# Altium PCB MD040_RevE2.PcbDoc (part 3 of 6)
Units mm, origin at the board's own origin, x right, y up, seen from the top; angles counter-clockwise.
Board outline 127 x 127 mm, 4 copper layers (Top Layer, Signal Layer 1, Signal Layer 2, Bottom Layer), stack 1.554 mm thick; 336 components, 206 nets, 924 pads, 303 vias.
Unrouted connection lines stored in the file: 125.
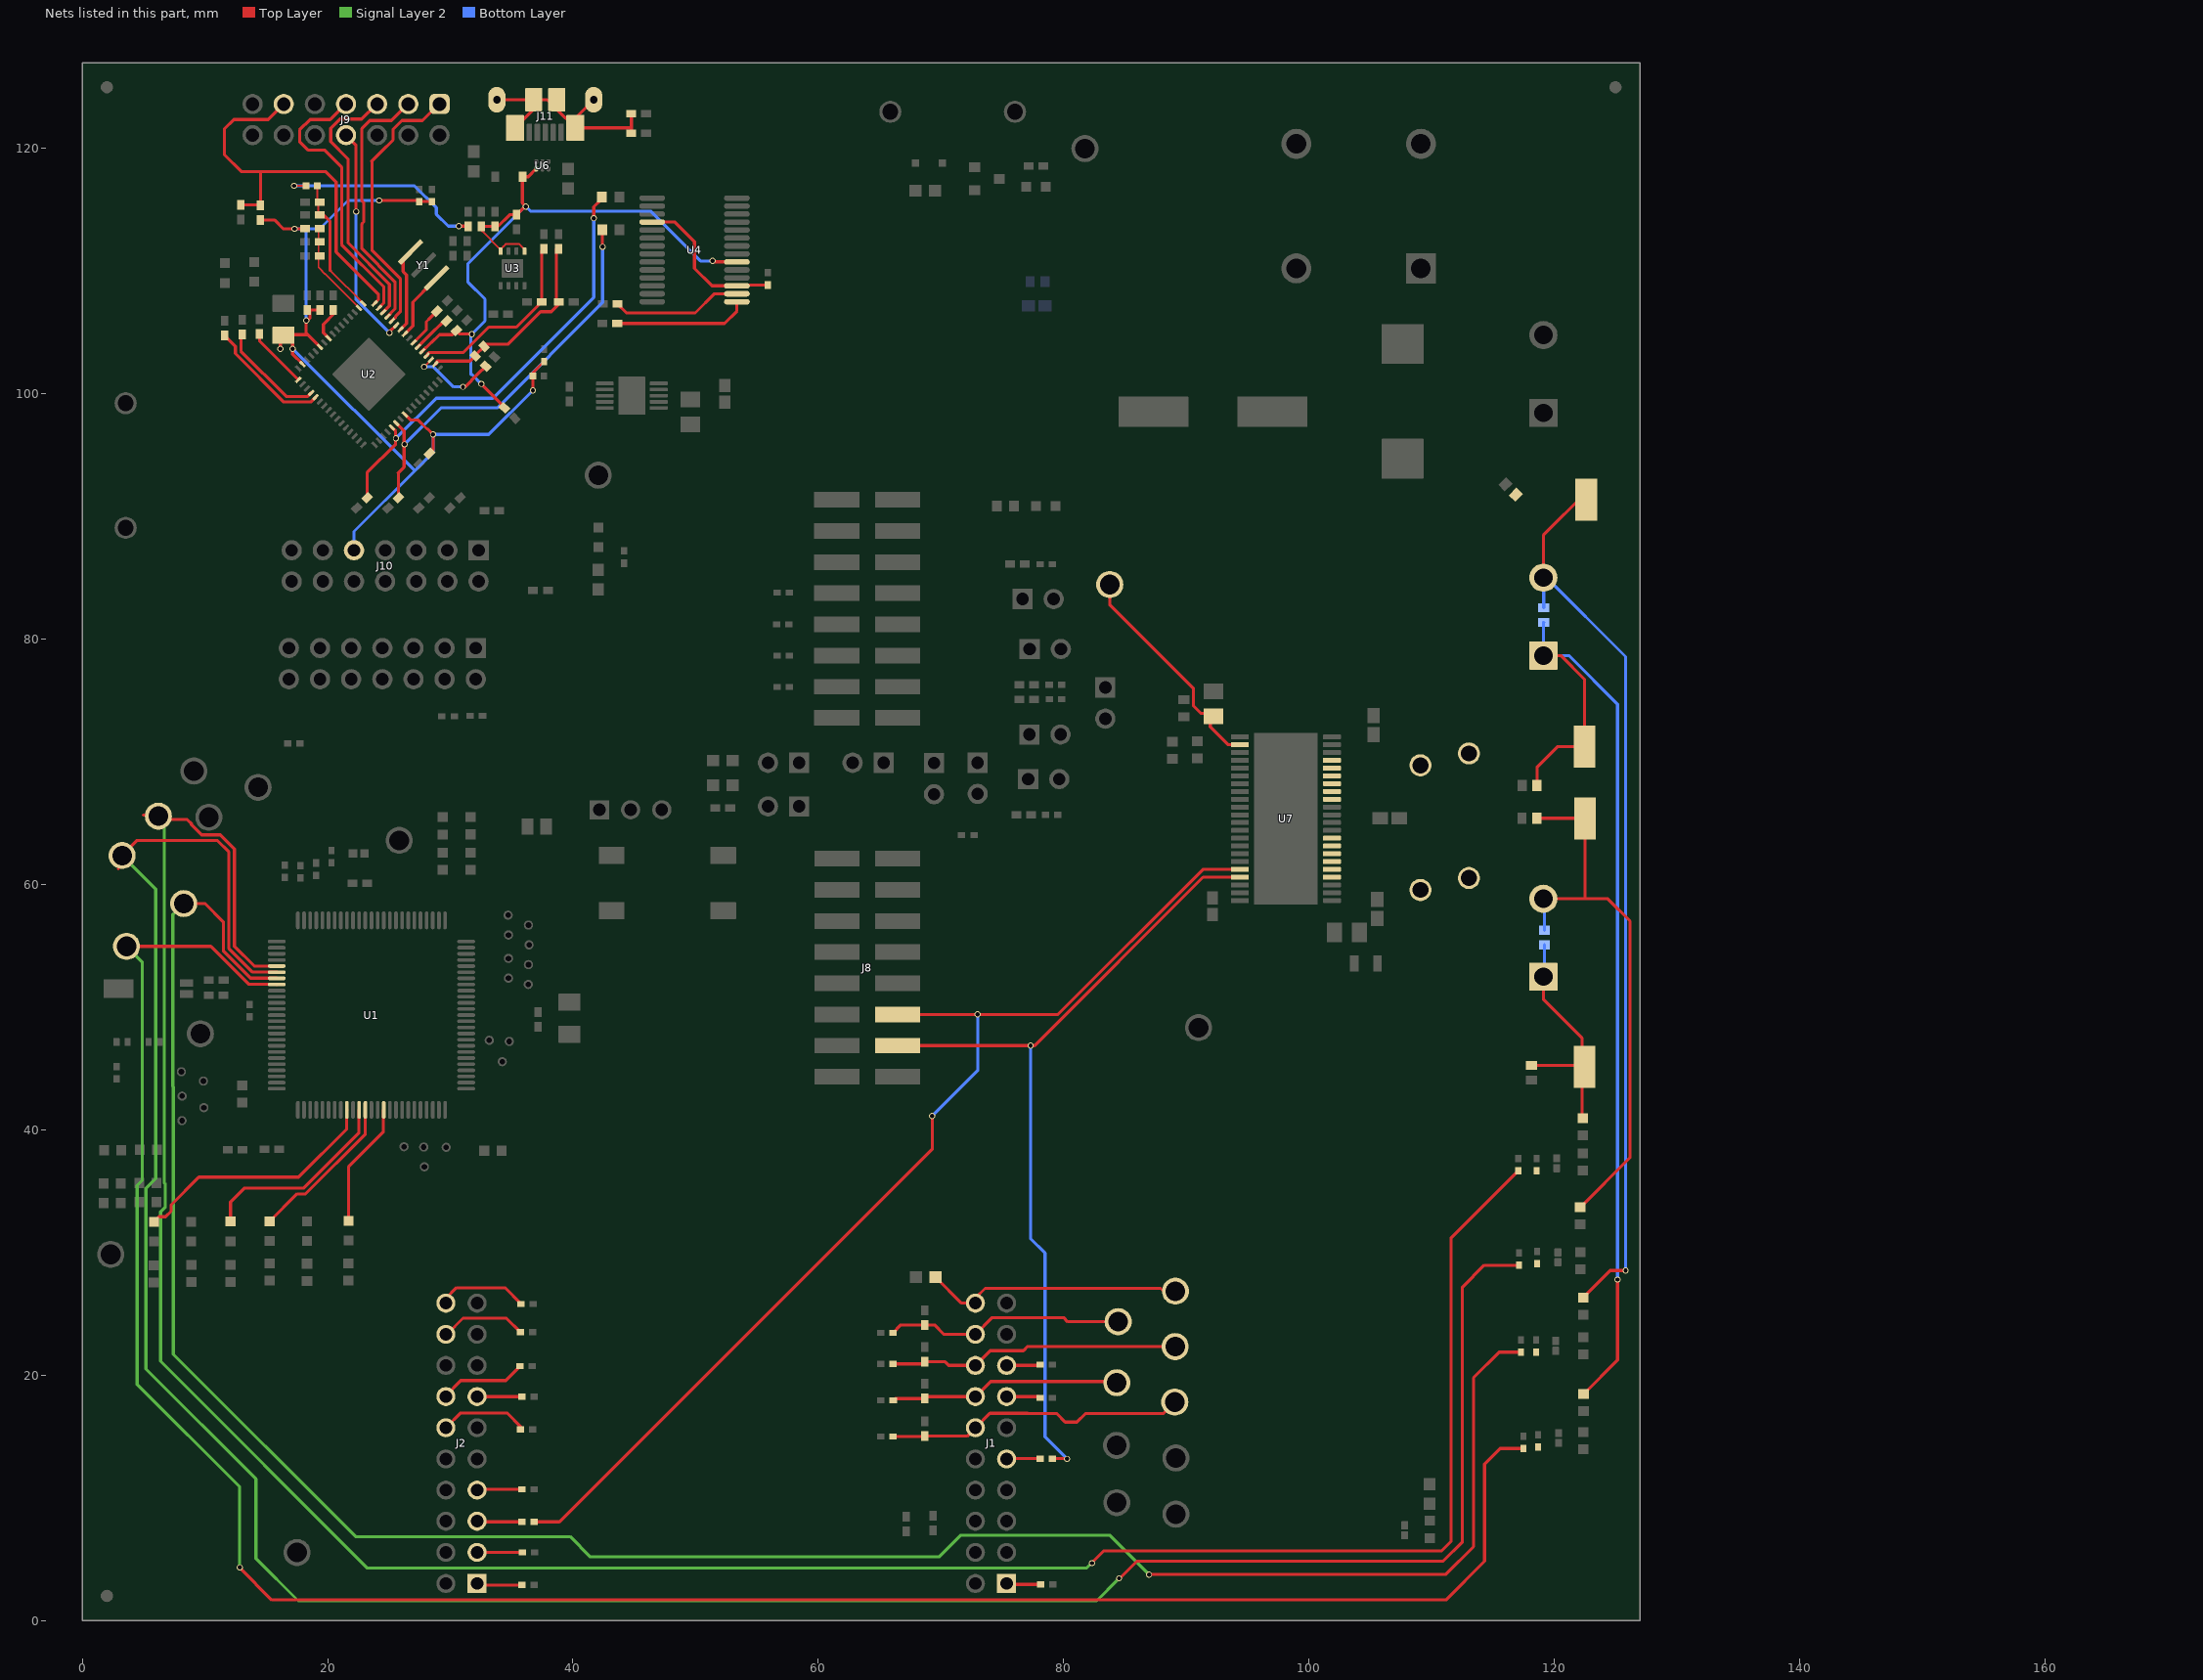
[diagram p5: the nets of this part, all layers, seen from the top]

## Footprints (in the part's own frame and the unit in brackets; to place one, negate y for a bottom-side part, rotate by r counter-clockwise, add the part's x,y. Pads: shape width x height; smd on the part's side, far side on the other; paste and mask are expansions set on the pad) (continued)
Wurth_61301421121 [mm] "Header, 2.54mm, 7x2, TH"
  rrect50% 1.65x1.65 hole 1.1: 1(-1.27,7.62)
  round 1.65 hole 1.1: 2(1.27,7.62) 3(-1.27,5.08) 4(1.27,5.08) 5(-1.27,2.54) 6(1.27,2.54) 7(-1.27,0) 8(1.27,0) 9(-1.27,-2.54) 10(1.27,-2.54) 11(-1.27,-5.08) 12(1.27,-5.08) 13(-1.27,-7.62) 14(1.27,-7.62)
  body extent -2.54,-8.89 2.54,8.89, height 8.55
XTAL_MS3V-T1R [mm] "Micro Crystal Switzerland recommended land pattern"
  rect 1.1x0.6 smd: 1(-2.775,0.45) 2(-2.775,-0.45)
  rect 2.4x1.5 smd: 3(2.775,0)
  silkscreen extent -1.9,-0.74 1.2,0.74, body extent -3.05,-0.74 3.65,0.74, height 1.42

## Part data
A1 A2 A3 A4 TP13 TP14 TP15 TP16 TP17 TP37 TP38 TP39 TP40 TP41 TP42 TP43 TP44 TP45 TP46: library part CMP-0055149-1, "Test Point, Multipurpose, White, TH", Color=White, Manufacturer=Keystone, Supplier Part Number 1=36-5012-ND, CNHeader=FALSE, ComponentLink1Description="Datasheet URL", ComponentLink1URL=http://www.keyelco.com/userAssets/file/M60-2p60.pdf, CompType="Test Point", ContactFinish=Silver, CT=TRUE, Green_EU RoHS=Passed, Green_EU RoHS-2=Incomplete, Green_Lifecycle=Active, Green_REACh=Passed, LatestRevisionDate=26/05/2017, MountType=TH, PackageReference="White Multipurpose Testpoint", PartNumber=5012, Publisher="Texas Instruments", RoHS=Y, Supplier 1=Digi-Key, Supplier 2=Mouser, Supplier Part Number 2=534-5012
C1 C2 C3 C4 C5 C6 C19 C22 C24: library part CMP-0006250-2, "CAP, CERM, 33 pF, 50 V, +/- 5%, C0G/NP0, 0402", Cap_Case=0402, Manufacturer=TDK, Supplier Part Number 1=445-1241-1-ND, TempCo=C0G/NP0, Tolerance_%=5%, Value1=Unknown, Value2=50V, ValueDisplayed=33pF, AEC Category=Q200, AEC Qualified=?, Cap_F=33pF, ComponentLink1Description="Datasheet link", ComponentLink1URL=http://product.tdk.com/en/catalog/datasheets/mlcc_commercial_general_en.pdf, CompType=Capacitor, LatestRevisionDate=2017-03-09, MountType=SMT, PackageReference=0402, PartNumber=C1005C0G1H330J050BA, Polarized=N, Published=2008-06-19, Publisher="Texas Instruments", RoHS=Y, SizeArea_mm2=0.5, SizeAreaWB_mm2=3, SizeX_mm=1, SizeY_mm=0.5, SizeZ_mm=0.6, Supplier 1=Digi-Key, Supplier 2=Newark, Supplier 3=Mouser, Supplier Part Number 2=72W1722, Supplier Part Number 3=810-C1005C0G1H330J, TaMax_C=125°C, TaMin_C=-55°C, Technology=Ceramic, U/M=EA, VDC_V=50V
C7 C8 C9 C10 C11 C12 C15 C41 C62: library part CMP-0006221-1, "CAP, CERM, 0.1 uF, 10 V, +/- 20%, X5R, 0402", Cap_Case=0402, Manufacturer="Wurth Elektronik", Supplier Part Number 1=732-7487-1-ND, TempCo=X5R, Tolerance_%=20%, Value1=Unknown, Value2=10V, ValueDisplayed=0.1uF, AEC Category=Q200, AEC Grade=N/A, AEC Qualified=N, Cap_F=100nF, ComponentLink1Description="Datasheet link", ComponentLink1URL=http://katalog.we-online.de/pbs/datasheet/885012105010.pdf, CompType=Capacitor, LatestRevisionDate=2017-03-09, MountType=SMT, PackageReference=0402, PartNumber=885012105010, Polarized=N, Published=2008-06-19, Publisher="Texas Instruments", RoHS=Y, SizeArea_mm2=0.5, SizeAreaWB_mm2=3, SizeX_mm=1, SizeY_mm=0.5, SizeZ_mm=0.6, Supplier 1=Digi-Key, Supplier 2=Mouser, Supplier Part Number 2=710-885012105010, TaMax_C=85°C, TaMin_C=-55°C, Technology=Ceramic, U/M=EA, VDC_V=10V
C13: library part CMP-0006580-1, "CAP, CERM, 0.47 uF, 10 V, +/- 10%, X5R, 0402", Cap_Case=0402, Manufacturer=MuRata, Supplier Part Number 1=490-3264-1-ND, TempCo=X5R, Tolerance_%=10%, Value1=Unknown, Value2=10V, ValueDisplayed=0.47uF, AEC Category=Q200, AEC Qualified=?, Cap_F=470nF, ComponentLink1Description="Datasheet link", ComponentLink1URL=http://search.murata.co.jp/Ceramy/PnsearchViewAction.do?HnOFG=ON&HnNFG=ON&SEL_CNT=50&sLang=en&sKey=GRM155R61A474KE15D&x=9&y=9&search=startwith, CompType=Capacitor, LatestRevisionDate=2017-03-09, MountType=SMT, PackageReference=0402, PartNumber=GRM155R61A474KE15D, Polarized=N, Published=2008-06-19, Publisher="Texas Instruments", RoHS=Y, SizeArea_mm2=0.5, SizeAreaWB_mm2=3, SizeX_mm=1, SizeY_mm=0.5, SizeZ_mm=0.6, Supplier 1=Digi-Key, Supplier 2=Newark, Supplier 3=Mouser, Supplier Part Number 2=14T3277, Supplier Part Number 3=81-GRM155R61A474KE5D, TaMax_C=85°C, TaMin_C=-55°C, Technology=Ceramic, U/M=EA, VDC_V=10V
C14 C31: library part CMP-0084376-1, "CAP, Tantalum Polymer, 10 µF, 10 V,+/- 20%, 0.08 ohm, 3216-18 SMD", Cap_Case=3216-18, Manufacturer=Kemet, Tolerance_%=20%, Value1="0.08 ohm", Value2=10V, ValueDisplayed=10µF, AEC Category=Q200, AEC Grade=N/A, AEC Qualified=N, Cap_F=10µF, ComponentLink1Description="Datasheet link", ComponentLink1URL=https://content.kemet.com/datasheets/KEM_T2076_T52X-530.pdf, CompType=Capacitor, ESR_ohm=0.08, MountType=SMT, PackageReference=3216-18, PartNumber=T520A106M010ATE080, Polarized=Y, RoHS=Y, Series=T520, SizeArea_mm2=5.12, SizeAreaWB_mm2=10.92, SizeX_mm=3.2, SizeY_mm=1.6, SizeZ_mm=1.8, TaMax_C=105°C, TaMin_C=-55°C, Technology="Tantalum Polymer", VDC_V=10V
C16 C17 C18 C21 C25 C32 C33 C34 C36 C48: library part CMP-0006562-2, "CAP, CERM, 0.1 uF, 10 V, +/- 10%, X5R, 0402", Cap_Case=0402, Manufacturer=MuRata, Supplier Part Number 1=490-1318-1-ND, TempCo=X5R, Tolerance_%=10%, Value1=Unknown, Value2=10V, ValueDisplayed=0.1uF, AEC Category=Q200, AEC Qualified=?, Cap_F=100nF, ComponentLink1Description="Datasheet link", ComponentLink1URL=http://search.murata.co.jp/Ceramy/PnsearchViewAction.do?HnOFG=ON&HnNFG=ON&SEL_CNT=50&sLang=en&sKey=GRM155R61A104KA01D&x=9&y=9&search=startwith, CompType=Capacitor, LatestRevisionDate=2017-03-09, MountType=SMT, PackageReference=0402, PartNumber=GRM155R61A104KA01D, Polarized=N, Published=2008-06-19, Publisher="Texas Instruments", RoHS=Y, SizeArea_mm2=0.5, SizeAreaWB_mm2=3, SizeX_mm=1, SizeY_mm=0.5, SizeZ_mm=0.6, Supplier 1=Digi-Key, Supplier 2=Mouser, Supplier 3=Farnell, Supplier Part Number 2=81-GRM155R61A104KA01, Supplier Part Number 3=1828862, TaMax_C=85°C, TaMin_C=-55°C, Technology=Ceramic, U/M=EA, VDC_V=10V
C20: library part CMP-0006269-2, "CAP, CERM, 4.7 uF, 10 V, +/- 20%, X5R, 0402", Cap_Case=0402, Manufacturer=TDK, Supplier Part Number 1=445-8023-1-ND, TempCo=X5R, Tolerance_%=20%, Value1=Unknown, Value2=10V, ValueDisplayed=4.7uF, AEC Category=Q200, AEC Grade=N/A, AEC Qualified=N, Cap_F=4.7µF, ComponentLink1Description="Datasheet link", ComponentLink1URL=http://product.tdk.com/en/catalog/datasheets/mlcc_commercial_general_en.pdf, CompType=Capacitor, LatestRevisionDate=2017-03-09, MountType=SMT, PackageReference=0402, PartNumber=C1005X5R1A475M050BC, Polarized=N, Published=2008-06-19, Publisher="Texas Instruments", RoHS=Y, SizeArea_mm2=0.5, SizeAreaWB_mm2=3, SizeX_mm=1, SizeY_mm=0.5, SizeZ_mm=0.6, Supplier 1=Digi-Key, Supplier 2=Newark, Supplier 3=Mouser, Supplier Part Number 2=04X3214, Supplier Part Number 3=810-C1005X5R1A475M, TaMax_C=85°C, TaMin_C=-55°C, Technology=Ceramic, U/M=EA, VDC_V=10V
C23: library part CMP-0006673-2, "CAP, CERM, 1000 pF, 50 V, +/- 10%, X7R, 0402", Cap_Case=0402, Manufacturer=MuRata, Supplier Part Number 1=490-1303-1-ND, TempCo=X7R, Tolerance_%=10%, Value1=Unknown, Value2=50V, ValueDisplayed=1000pF, AEC Category=Q200, AEC Qualified=?, Cap_F=1nF, ComponentLink1Description="Datasheet link", ComponentLink1URL=http://search.murata.co.jp/Ceramy/PnsearchViewAction.do?HnOFG=ON&HnNFG=ON&SEL_CNT=50&sLang=en&sKey=GRM155R71H102KA01D&x=9&y=9&search=startwith, CompType=Capacitor, LatestRevisionDate=2017-03-09, MountType=SMT, PackageReference=0402, PartNumber=GRM155R71H102KA01D, Polarized=N, Published=2008-06-19, Publisher="Texas Instruments", RoHS=Y, SizeArea_mm2=0.5, SizeAreaWB_mm2=3, SizeX_mm=1, SizeY_mm=0.5, SizeZ_mm=0.6, Supplier 1=Digi-Key, Supplier 2=Newark, Supplier 3=Mouser, Supplier Part Number 2=14T3283, Supplier Part Number 3=81-GRM36X102K50, TaMax_C=125°C, TaMin_C=-55°C, Technology=Ceramic, U/M=EA, VDC_V=50V
C26 C27 C42 C43: library part CMP-0064916-2, "CAP, CERM, 10 pF, 50 V,+/- 1%, C0G/NP0, 0402", Cap_Case=0402, Manufacturer=MuRata, Supplier Part Number 1=490-6186-1-ND, TempCo=C0G/NP0, Tolerance_%=1%, Value1=Unknown, Value2=50V, ValueDisplayed=10pF, AEC Category=Q200, AEC Grade=N/A, AEC Qualified=N, Cap_F=10pF, ComponentLink1Description="Datasheet link", ComponentLink1URL=http://psearch.en.murata.com/capacitor/product/GRM1555C1H100FA01%23.pdf, CompType=Capacitor, LatestRevisionDate=2017-06-05, MountType=SMT, PackageReference=0402, PartNumber=GRM1555C1H100FA01D, Polarized=N, Published=2008-06-19, Publisher="Texas Instruments", RoHS=Y, SizeArea_mm2=0.5, SizeAreaWB_mm2=3, SizeX_mm=1, SizeY_mm=0.5, SizeZ_mm=0.6, Supplier 1=Digi-Key, Supplier 2=Mouser, Supplier Part Number 2=81-GRM1555C1H100FA1D, TaMax_C=125°C, TaMin_C=-55°C, Technology=Ceramic, U/M=EA, VDC_V=50V
C28 C30 C47: library part CMP-0006570-2, "CAP, CERM, 0.22 uF, 10 V, +/- 10%, X5R, 0402", Cap_Case=0402, Manufacturer=MuRata, Supplier Part Number 1=490-3910-1-ND, TempCo=X5R, Tolerance_%=10%, Value1=Unknown, Value2=10V, ValueDisplayed=0.22uF, AEC Category=Q200, AEC Qualified=?, Cap_F=220nF, ComponentLink1Description="Datasheet link", ComponentLink1URL=http://search.murata.co.jp/Ceramy/PnsearchViewAction.do?HnOFG=ON&HnNFG=ON&SEL_CNT=50&sLang=en&sKey=GRM155R61A224KE19D&x=9&y=9&search=startwith, CompType=Capacitor, LatestRevisionDate=2017-03-09, MountType=SMT, PackageReference=0402, PartNumber=GRM155R61A224KE19D, Polarized=N, Published=2008-06-19, Publisher="Texas Instruments", RoHS=Y, SizeArea_mm2=0.5, SizeAreaWB_mm2=3, SizeX_mm=1, SizeY_mm=0.5, SizeZ_mm=0.6, Supplier 1=Digi-Key, Supplier 2=Newark, Supplier 3=Mouser, Supplier Part Number 2=38K1646, Supplier Part Number 3=81-GRM155R61A224KE19, TaMax_C=85°C, TaMin_C=-55°C, Technology=Ceramic, U/M=EA, VDC_V=10V
C29: library part CMP-0006600-2, "CAP, CERM, 0.47 uF, 16 V, +/- 10%, X5R, 0402", Cap_Case=0402, Manufacturer=MuRata, TempCo=X5R, Tolerance_%=10%, Value1=Unknown, Value2=16V, ValueDisplayed=0.47uF, AEC Category=Q200, AEC Qualified=?, Cap_F=470nF, ComponentLink1Description="Datasheet link", ComponentLink1URL=http://psearch.murata.com/capacitor/product/GRM155R61C474KE01%23.pdf, CompType=Capacitor, LatestRevisionDate=2017-03-09, MountType=SMT, PackageReference=0402, PartNumber=GRM155R61C474KE01, Polarized=N, Published=2008-06-19, Publisher="Texas Instruments", RoHS=Y, SizeArea_mm2=0.5, SizeAreaWB_mm2=3, SizeX_mm=1, SizeY_mm=0.5, SizeZ_mm=0.6, TaMax_C=85°C, TaMin_C=-55°C, Technology=Ceramic, U/M=EA, VDC_V=16V
C35 C40 C45: library part CMP-0064924-2, "CAP, CERM, 1 uF, 10 V,+/- 20%, X5R, 0402", Cap_Case=0402, Manufacturer="Wurth Elektronik", Supplier Part Number 1=732-7489-1-ND, TempCo=X5R, Tolerance_%=20%, Value1=Unknown, Value2=10V, ValueDisplayed=1uF, AEC Category=Q200, AEC Grade=N/A, AEC Qualified=N, Cap_F=1µF, ComponentLink1Description="Datasheet link", ComponentLink1URL=http://katalog.we-online.de/pbs/datasheet/885012105012.pdf, CompType=Capacitor, LatestRevisionDate=2017-06-05, MountType=SMT, PackageReference=0402, PartNumber=885012105012, Polarized=N, Published=2008-06-19, Publisher="Texas Instruments", RoHS=Y, SizeArea_mm2=0.5, SizeAreaWB_mm2=3, SizeX_mm=1, SizeY_mm=0.5, SizeZ_mm=0.6, Supplier 1=Digi-Key, Supplier 2=Newark, Supplier 3=Mouser, Supplier Part Number 2=75Y5997, Supplier Part Number 3=710-885012105012, TaMax_C=85°C, TaMin_C=-55°C, Technology=Ceramic, U/M=EA, VDC_V=10V
C37 C39: library part CMP-0006639-2, "CAP, CERM, 0.01 uF, 16 V, +/- 10%, X7R, 0402", Cap_Case=0402, Manufacturer=MuRata, Supplier Part Number 1=490-1313-1-ND, TempCo=X7R, Tolerance_%=10%, Value1=Unknown, Value2=16V, ValueDisplayed=0.01uF, AEC Category=Q200, AEC Qualified=?, Cap_F=10nF, ComponentLink1Description="Datasheet link", ComponentLink1URL=http://search.murata.co.jp/Ceramy/PnsearchViewAction.do?HnOFG=ON&HnNFG=ON&SEL_CNT=50&sLang=en&sKey=GRM155R71C103KA01D&x=9&y=9&search=startwith, CompType=Capacitor, LatestRevisionDate=2017-03-09, MountType=SMT, PackageReference=0402, PartNumber=GRM155R71C103KA01D, Polarized=N, Published=2008-06-19, Publisher="Texas Instruments", RoHS=Y, SizeArea_mm2=0.5, SizeAreaWB_mm2=3, SizeX_mm=1, SizeY_mm=0.5, SizeZ_mm=0.6, Supplier 1=Digi-Key, Supplier 2=Newark, Supplier 3=Mouser, Supplier Part Number 2=14T3279, Supplier Part Number 3=81-GRM36X103K16, TaMax_C=125°C, TaMin_C=-55°C, Technology=Ceramic, U/M=EA, VDC_V=16V
C38: library part CMP-0006594-2, "CAP, CERM, 2.2 uF, 16 V, +/- 10%, X5R, 0402", Cap_Case=0402, Manufacturer=MuRata, PartNumber=GRM155R61C225KE11D, Supplier Part Number 1=490-10695-1-ND, TempCo=X5R, Tolerance_%=10%, Value1=Unknown, Value2=16V, AEC Category=Q200, AEC Grade=N/A, AEC Qualified=N, Cap_F=2.2µF, ComponentLink1Description="Datasheet link", ComponentLink1URL=http://psearch.en.murata.com/capacitor/product/GRM155R61C225KE11%23.pdf, CompType=Capacitor, LatestRevisionDate=2017-03-09, MountType=SMT, PackageReference=0402, Polarized=N, Published=2008-06-19, Publisher="Texas Instruments", RoHS=Y, SizeArea_mm2=0.5, SizeAreaWB_mm2=3, SizeX_mm=1, SizeY_mm=0.5, SizeZ_mm=0.6, Supplier 1=Digi-Key, Supplier 2=Mouser, Supplier Part Number 2=81-GRM155R61C225KE1D, TaMax_C=85°C, TaMin_C=-55°C, Technology=Ceramic, U/M=EA, ValueDisplayed=2.2uF, VDC_V=16V
C44 C50 C55: library part CMP-14477-003474-1, "Ceramic Capacitor General Use 0.1uF ±20% 100V X5R 0603", Capacitance=100nF, Case/Package=Ceramic, Dielectric=X5R, Max Operating Temperature=85°C, Min Operating Temperature=-55°C, Tolerance=20%, Voltage Rating=100V, Depth=0.8mm, Halogen Free="Halogen Free", Lead Free="Lead Free", Length=1.6mm, Mount="Surface Mount", Packaging="Tape and Reel", Radiation Hardening=No, RoHS Compliant=Yes, Thickness=0.035inch, Voltage Rating (DC)=100V, Width=0.031inch
C46: library part CMP-0008271-1, "CAP, CERM, 3.3 uF, 25 V, +/- 10%, X6S, 0805", Cap_Case=0805, Manufacturer=MuRata, Supplier Part Number 1=GRM21BC81E335KA73L-ND, TempCo=X6S, Tolerance_%=10%, Value1=Unknown, Value2=25V, ValueDisplayed=3.3uF, AEC Category=Q200, AEC Qualified=?, Cap_F=3.3µF, ComponentLink1Description="Datasheet link", ComponentLink1URL=http://search.murata.co.jp/Ceramy/PnsearchViewAction.do?HnOFG=ON&HnNFG=ON&SEL_CNT=50&sLang=en&sKey=GRM21BC81E335KA73L&x=9&y=9&search=startwith, CompType=Capacitor, LatestRevisionDate=2017-03-09, MountType=SMT, PackageReference=0805, PartNumber=GRM21BC81E335KA73L, Polarized=N, Published=2008-06-19, Publisher="Texas Instruments", RoHS=Y, SizeArea_mm2=2.5, SizeAreaWB_mm2=6.75, SizeX_mm=2, SizeY_mm=1.25, SizeZ_mm=1.45, Supplier 1=Digi-Key, Supplier 2=Mouser, Supplier Part Number 2=81-GRM21BC81E335KA3L, TaMax_C=105°C, TaMin_C=-55°C, Technology=Ceramic, U/M=EA, VDC_V=25V
C49 C51: library part CMP-0007873-2, "CAP, CERM, 1 uF, 50 V, +/- 10%, X7R, 0805", Cap_Case=0805, Manufacturer=TDK, Supplier Part Number 1=445-7547-1-ND, TempCo=X7R, Tolerance_%=10%, Value1="0.008782 ohm", Value2=50V, ValueDisplayed=1uF, AEC Category=Q200, AEC Grade=N/A, AEC Qualified=N, Cap_F=1µF, ComponentLink1Description="Datasheet link", ComponentLink1URL=https://product.tdk.com/en/search/capacitor/ceramic/mlcc/info?part_no=C2012X7R1H105K125AB, CompType=Capacitor, ESR_ohm=8.782m, IRMS_A=2.2049A, LatestRevisionDate=2017-03-09, MountType=SMT, PackageReference=0805, PartNumber=C2012X7R1H105K125AB, Polarized=N, Published=2008-06-19, Publisher="Texas Instruments", RoHS=Y, SizeArea_mm2=2.5, SizeAreaWB_mm2=6.75, SizeX_mm=2, SizeY_mm=1.25, SizeZ_mm=1.45, Supplier 1=Digi-Key, Supplier 2=Mouser, Supplier Part Number 2=810-C2012X7R1H105K, TaMax_C=125°C, TaMin_C=-55°C, Technology=Ceramic, U/M=EA, VDC_V=50V
C52 C54 C60 C61 C64 C65 C66: library part CMP-2006-03016-2, "CAP CER 1000PF 100V X7R 0603", Capacitance="1,000 pF", Manufacturer=KEMET, Package=C0603C-CF, Temperature="-55°C to +125°C", Temperature Characteristic=X7R, Temperature Coefficient=30ppm/°C, Temperature Range High=+125°C, Temperature Range Low=-55°C, Tolerance=0.1, Voltage Rating="100 V", Automotive=Yes, Automotive Grade="Grade 1", Category=Cap, ComponentLink2Description=Datasheet, ComponentLink2URL=https://api.kemet.com/component-edge/download/datasheet/C0603C100J5GACAUTO.pdf, Device Class L1="Passive Components", Device Class L2=Capacitors, Device Class L3="Ceramic Capacitors", Digikey Description="CAP CER 1000PF 100V X7R 0603", Height=0.87mm, Lead Free=Yes, Manufacturer Part Number=C0603C102K1RACAUTO, Material=Ceramic, Mouser Description="Multilayer Ceramic Capacitors MLCC - SMD/SMT 1000pF 100volts 10% X7R AUTO", Octopart=https://octopart.com/c0603c102k1racauto-kemet-12573995, RoHS=TRUE
C53: library part CMP-0094051-1, "100uF 100V 20% Aluminum Electrolytic Capacitors Radial, Can - SMD - 5000 Hrs @ 105°C", Digikey Part Number=565-2511-1-ND, Leakage Current=100uA, Manufacturer="United Chemi-Con", Mouser Part Number=661-EMVY101ARA101MKE, Operating Temperature Range="-40°C to +105°C", Tolerance_%=20%, ValueDisplayed=100uF, AEC Grade="Grade 2", AEC Qualified=Yes, Cap_F=100µF, ComponentLink1Description=Datasheet, ComponentLink1URL=https://www.chemi-con.co.jp/products/relatedfiles/capacitor/catalog/MVYRA-e.PDF, datasheet=https://www.chemi-con.co.jp/products/relatedfiles/capacitor/catalog/MVYRA-e.PDF, Datasheet Path=datasheets/Cap-EMVY101ARA101MKE0S.pdf, Digikey Description="CAP ALUM 100UF 20% 100V SMD", Dissipation Factor=10%, helpURL=https://upverter.com/upn/revision/452647827c621875/, IRMS_A=450mA, Lead Free=Yes, Life=5000Hours, Mouser Description="Cap Aluminum Lytic 100uF 100V 20% (12.5 X 13.5mm) SMD 450mA 5000h 105C Automotive T/R", PackageReference=RADIAL, Part Number=EMVY101ARA101MKE0S, PartNumber=EMVY101ARA101MKE0S, RoHS=TRUE, SizeZ_mm=14mm, Supplier 1=Digikey, Supplier 2=Mouser, Supplier Part Number 1=565-2511-1-ND, Supplier Part Number 2=661-EMVY101ARA101MKE, VDC_V=100V
C56: library part CMP-06035-000063-1, "CAP CER 1UF 100V X7S 0805", Capacitance=1uF, Manufacturer=Murata, Package=GRM21-0.2, Temperature="-55°C to +125°C", Temperature Characteristic=X7S, Temperature Coefficient=22%, Temperature Range High=+125°C, Temperature Range Low=-55°C, Tolerance=10%, Voltage Rating=100V, Automotive=No, Category=Cap, ComponentLink2Description=Datasheet, ComponentLink2URL=https://search.murata.co.jp/Ceramy/image/img/A01X/G101/ENG/GRM21BC72A105KE01-01A.pdf, Device Class L1="Passive Components", Device Class L2=Capacitors, Device Class L3="Ceramic Capacitors", Digikey Description="CAP CER 1UF 100V X7S 0805", Height=1.45mm, Ipc Land Pattern Name=CAPC200125X125, Lead Free=Yes, Manufacturer Part Number=GRM21BC72A105KE01L, Material=Ceramic, Octopart=https://octopart.com/grm21bc72a105ke01l-murata-71014565, RoHS=TRUE
C57 C58 C59: library part CMP-14477-001102-1, "Ceramic Capacitor General Use 0.01uF ±20% 100V X7R 0603", Capacitance=10nF, Case/Package=0603, Max Operating Temperature=125°C, Min Operating Temperature=-55°C, Tolerance=20%, Voltage Rating=100V, Length=0.063inch, Mount="Surface Mount", Packaging="Tape and Reel", RoHS Compliant=Yes, Thickness=0.035inch, Width=0.031inch
C63: library part CMP-1035-02591-1, "CAP 100nF 50V ±5% 0603 (1608 Metric) Thickness 1mm SMD", Case-EIA=0603, Case-Metric=1608, Rated Voltage="50 V", Tolerance=Â±5%, Max Thickness="1 mm", Technology=SMT
C67 C68 C69 C70 C71: library part CMP-0087080-2, "CAP CER 100PF 100V X8R 0402", Manufacturer=Kemet, TempCo=15%, Tolerance_%=5%, AEC Grade=NA, AEC Qualified=No, Cap_F=100pF, ComponentLink1Description=Datasheet, ComponentLink1URL=https://content.kemet.com/datasheets/KEM_C1007_X8R_ULTRA_150C_SMD.pdf, PackageReference=0402, PartNumber=C0402C101J1HACTU, RoHS=TRUE, SizeZ_mm=0.55mm, Symbol Name=SYM-C0402C101J1HAC, VDC_V=100V
C72 C73: library part CMP-0006227-2, "CAP, CERM, 0.01 uF, 16 V, +/- 10%, X7R, 0402", Cap_Case=0402, Manufacturer="Wurth Elektronik", Supplier Part Number 1=710-885012205031, TempCo=X7R, Tolerance_%=10%, Value1=Unknown, Value2=16V, ValueDisplayed=0.01uF, AEC Category=Q200, AEC Grade=N/A, AEC Qualified=N, Cap_F=10nF, ComponentLink1Description="Datasheet link", ComponentLink1URL=http://katalog.we-online.de/pbs/datasheet/885012205031.pdf, CompType=Capacitor, LatestRevisionDate=2017-03-09, MountType=SMT, PackageReference=0402, PartNumber=885012205031, Polarized=N, Published=2008-06-19, Publisher="Texas Instruments", RoHS=Y, SizeArea_mm2=0.5, SizeAreaWB_mm2=3, SizeX_mm=1, SizeY_mm=0.5, SizeZ_mm=0.6, Supplier 1=Mouser, TaMax_C=125°C, TaMin_C=-55°C, Technology=Ceramic, U/M=EA, VDC_V=16V
C74: library part CMP-1036-03017-2, "CAP CER 1100PF 50V NP0 0805", Capacitance="1,100 pF", Manufacturer=KEMET, Manufacturer Part Number=C0805C112F5GACTU, Package=C0805C-DN, Temperature="-55°C to +125°C", Temperature Characteristic=C0G, Temperature Coefficient=30ppm/°C, Temperature Range High=+125°C, Temperature Range Low=-55°C, Tolerance=0.01, Voltage Rating="50 V", Automotive=No, Category=Cap, ComponentLink2Description=Datasheet, ComponentLink2URL=https://content.kemet.com/datasheets/KEM_C1003_C0G_SMD.pdf, Device Class L1="Passive Components", Device Class L2=Capacitors, Device Class L3="Ceramic Capacitors", Digikey Description="CAP CER 1100PF 50V NP0 0805", Height=0.88mm, Ipc Land Pattern Name=CAPC200125X78, Lead Free=Yes, Material=Ceramic, Mouser Description="Multilayer Ceramic Capacitors MLCC - SMD/SMT 50volts 1100pF C0G 1%", Octopart=https://octopart.com/c0805c112f5gactu-kemet-19050258, RoHS=TRUE
D1: library part CMP-0002947-3, "LED, Red, SMD", Color=Red, Manufacturer="Wurth Elektronik", Power_TotalModule=72mW, Value1=0.072W, Value2=2V, Angle=140, ComponentLink1Description="Datasheet link", ComponentLink1URL=http://katalog.we-online.de/led/datasheet/150060RS75000.pdf, CompType=LED, Io_A=30mA, MountType=SMT, PackageReference=LED_0603, PartNumber=150060RS75000, RoHS=Y, TJmax_C=85°C, Type=AlInGaP, Vf_V=2V, Vr_V=5V
D2: "LED, Green, SMD", Color=green, Manufacturer="Wurth Elektronik", PartNumber=150060VS75000, Value1=W, Value2=2V, ComponentLink1Description="Datasheet link", ComponentLink1URL=http://katalog.we-online.de/led/datasheet/150060VS75000.pdf, CompType=LED, Io_A=20mA, MountType=SMT, PackageReference=LED_0603, RoHS=Y, Type=AlInGaP, Vf_V=2V
D3: library part CMP-1055-00457-1, "Schottky Barrier Diode, 2-Pin SOD-323, Pb-Free, Tape and Reel", Manufacturer="On Semiconductor", ComponentLink1Description="Manufacturer URL", ComponentLink1URL=http://www.onsemi.com/, ComponentLink2Description=Datasheet, ComponentLink2URL=http://www.onsemi.cn/pub_link/Collateral/MMDL770T1-D.PDF, ComponentLink3Description="Package Specification", ComponentLink3URL=http://www.onsemi.com/pub_link/Collateral/477-02.PDF.1, Configuration=Single, DatasheetVersion="Rev. 3", Mounting Technology="Surface Mount", PackageDescription="2-Pin SOD, Body 1.7 x 1.25 mm", PackageReference=SOD-323-2-477-02, PackageVersion="Rev. H, 03/2007", Packing="Tape and Reel", PartNumber=MMDL770T1G, RoHS=TRUE
D4: library part CMP-1426-00004-1, "SMD mono-color Chip LED, WL-SMCW, Super Red", Color="Super Red", Manufacturer="Wuerth Elektronik", ComponentLink1Description="Manufacturer URL", ComponentLink1URL=http://www.we-online.com, ComponentLink2Description=Datasheet, ComponentLink2URL=http://katalog.we-online.com/led/datasheet/150060SS75000.pdf, PackageReference=0603_A, PartNumber=150060SS75000
D5 D6 D8: library part CMP-0002894-2, "LED, Green, SMD", Color=green, Manufacturer="Wurth Elektronik", Value1=W, Value2=2V, ComponentLink1Description="Datasheet link", ComponentLink1URL=http://katalog.we-online.de/led/datasheet/150060VS75000.pdf, CompType=LED, Io_A=20mA, MountType=SMT, PackageReference=LED_0603, PartNumber=150060VS75000, RoHS=Y, Type=AlInGaP, Vf_V=2V
D7: library part CMP-0002893-1, "LED, Super Red, SMD", Color="super red", Manufacturer="Wurth Elektronik", Supplier Part Number 1=732-4979-1-ND, Value1=W, Value2=1.9V, ComponentLink1Description="Datasheet link", ComponentLink1URL=http://katalog.we-online.de/led/datasheet/150060SS75000.pdf, CompType=LED, Io_A=20mA, LatestRevisionDate=2017-03-09, MountType=SMT, PackageReference=LED_0603, PartNumber=150060SS75000, Published=2008-07-11, Publisher="Texas Instruments", RoHS=Y, Supplier 1=Digi-Key, Supplier 2=Newark, Supplier 3=Farnell, Supplier Part Number 2=95W3796, Supplier Part Number 3=2322072, Type=AlInGaP, U/M=EA, Vf_V=1.9V
D9 D10 D11 D12: library part CMP-0002892-3, "LED, Yellow, SMD", Color=yellow, Manufacturer="Wurth Elektronik", Value1=W, Value2=2V, ComponentLink1Description="Datasheet link", ComponentLink1URL=http://katalog.we-online.de/led/datasheet/150060YS75000.pdf, CompType=LED, Io_A=20mA, MountType=SMT, PackageReference=LED_0603, PartNumber=150060YS75000, RoHS=Y, Type=AlInGaP, Vf_V=2V
D10 D11: library part CMP-0002894-2, "LED, Green, SMD"
D12: library part CMP-0002893-1, "LED, Super Red, SMD"
D13: library part CMP-14400-000003-1, "DIODE ZENER 4.7V 550MW SOD323F", Ambient Temperature Range High=+150°C, Ambient Temperature Range Low=-55°C, Forward Current=250mA, Manufacturer=Nexperia, Max Reverse Leakage Current=3uA, Max Zener Voltage=4.79V, Nom Zener Voltage=4.7V, Package=SOD323F, Power Dissipation=550mW, Reverse Voltage=2V, Temperature="to +150°C", Automotive=Yes, Automotive Grade="Grade 0", Category=Diode, ComponentLink2Description=Datasheet, ComponentLink2URL=https://assets.nexperia.com/documents/data-sheet/BZX84J_SER.pdf, Device Class L1="Discrete Semiconductors", Device Class L2=Diodes, Device Class L3="Zener Diodes", Digikey Description="DIODE ZENER 4.7V 550MW SOD323F", Footprint Url=https://assets.nexperia.com/documents/outline-drawing/SOD323F.pdf, Height=0.8mm, Lead Free=Yes, Manufacturer Part Number=BZX84J-B4V7,115, Max Junction Temp=+150°C, Octopart=https://octopart.com/bzx84j-b4v7%2C115-nexperia-78740280, RoHS=TRUE, Temperature Range High=+150°C, Zener Impedance=80Ω
F1: library part CMP-0081016-1, "Fuse, 15 A, 250 VAC, 100 VDC, SMD", Irating_A=15A, Manufacturer=Littelfuse, ComponentLink1Description="Datasheet URL", ComponentLink1URL=http://www.littelfuse.com/~/media/electronics/datasheets/fuses/littelfuse_fuse_463_datasheet.pdf.pdf, CompType=Fuse, Fuse Speed=Fast, Fuse Technology="Board Mount", Interrupt_AC=100A, Interrupt_DC=50A, MeltingTyp=142, MountType=SMT, PackageReference=10.1x3.12mm, PartNumber=0463015.ER, RoHS=Y, Rtyp_Ohm=4.7m, SizeArea_mm2=31.512, SizeAreaWB_mm2=61.952, SizeX_mm=10.1, SizeY_mm=3.12, SizeZ_mm=3.12, TaMax_C=125°C, TaMin_C=-55°C, VAC_V=250V, VDC_V=100V
FID1 FID2 FID3: library part CMP-0077181-1, "Fiducial mark.  There is nothing to buy or mount.", Manufacturer=N/A, ClassName=FiducialMark, CompType=Fiducial, MountType=N/A, PackageReference=N/A, PartNumber=N/A
H1 H2 H3 H4: library part CMP-0003678-1, "Standoff, Hex, 1.25\"L #6-32 Nylon", Manufacturer=Keystone, ComponentLink1Description="Datasheet Link", ComponentLink1URL=http://www.keyelco.com/userAssets/file/M60-2p70.pdf, CompType=Standoff, Key=4822, LatestRevisionDate=2017-03-09, MountType=N/A, PackageReference="6-32 HEX Nylon standoff 1.250 mil", PartNumber=4822, Publisher="Texas Instruments", RoHS=Y
H1_Nut H2_Nut H3_Nut H4_Nut: library part CMP-0003948-1, "Small nylon hex nut, 0.10 thick with a 0.250 outside diameter and a 4-40 threading", Manufacturer=Keystone, Supplier Part Number 1=36-9605-ND, ComponentLink1Description="Datasheet Link", ComponentLink1URL=http://www.keyelco.com/product-pdf.cfm?p=1912, CompType=Standoff, Key=9605, LatestRevisionDate=2017-03-09, MountType=N/A, PackageReference="Hex Nut,4-40 Thread, 250\" Head Dia", PartNumber=9605, Publisher="Texas Instruments", RoHS=Y, Supplier 1=Digi-Key, Supplier 2=Mouser, Supplier Part Number 2=534-9605
J1 J2: "Receptacle, 2.54mm, 10x2, Gold, TH", Color=Black, Current_A=6.3A, Manufacturer=Samtec, PartNumber=SSQ-110-03-G-D, Voltage_V=550V, Cert_CSA=Y, Cert_CULUS=N, Cert_UL=Y, Cert_VDE=N, CNHeader=False, ComponentLink1Description="Datasheet URL", ComponentLink1URL=https://www.samtec.com/ftppub/cpdf/SSQ-1XX-XX-XXX-X-XX-XXX-XX-X-MKT.pdf, CompType="Socket Strip", ContactFinish=Gold, CT=True, Gender=Female, LatestRevisionDate=2017-07-12, MountType=TH, Orientation=Vertical, PackageReference="Receptacle, 2.54mm, 10x2, TH", PinCount=20, Pitch_mm=2.54, Publisher="Texas Instruments", RoHS=Y, Row_Count=2, RowSpacing_mm=2.54
J3: library part CMP-0002339-2, "Header, 100mil, 7x2, Tin, TH", Color=Black, Current_A=3A, Manufacturer="Sullins Connector Solutions", PartNumber=PEC07DAAN, Supplier Part Number 1=S2012E-07-ND, Voltage_V=1.8kV, Cert_UL=Y, ClassName=Header, ComponentLink1Description="Datasheet URL", ComponentLink1URL=http://www.sullinscorp.com/catalogs/77_PAGE108-109_.100_MALE_HDR.pdf, CompType=Header, ContactFinish=Tin, Gender=Male, Green_EU RoHS=Passed, Green_EU RoHS-2=Passed, Green_Lifecycle=Active, Green_REACh=Passed, MountType=TH, Orientation=Vertical, PackageReference="Header, 7x2, 100mil, Tin", PinCount=14, Pitch_mm=2.54, RoHS=Y, Row_Count=2, RowSpacing_mm=2.54, Shrouded=N, Supplier 1=Digi-Key
J4 J8: library part CMP-0075595-1, "Header, 2.54mm, 8x2, Gold, SMT", Color=Black, Current_A=4.9A, Manufacturer=Samtec, Supplier Part Number 1=SAM8884-ND, Voltage_V=475V, Cert_CSA=Y, Cert_UL=Y, ClassName=Header, CNHeader=True, ComponentLink1Description="Datasheet URL", ComponentLink1URL=https://www.samtec.com/ftppub/cpdf/TSM-1XX-XX-XXX-XX-X-XXX-X-MKT.pdf, CompType=Header, ContactFinish=Gold, CT=False, Gender=Male, LatestRevisionDate=2017-07-12, MountType=SMT, Orientation=Vertical, PackageReference="Header, 2.54mm, 8x2, SMT", PartNumber=TSM-108-01-L-DV, PinCount=16, Pitch_mm=2.54, Publisher="Texas Instruments", RoHS=Y, Row_Count=2, RowSpacing_mm=2.54, Shrouded=N, Supplier 1=Digi-Key, Supplier 2=Newark, Supplier 3=Farnell, Supplier Part Number 2=97B2917, Supplier Part Number 3=2308473
J5 J6 J7 J16 J17 J18 J19 J20 J25 J26: library part CMP-0054566-1, "Header, 100mil, 2x1, Gold, TH", Color=Black, Current_A=3A, Manufacturer="Sullins Connector Solutions", Supplier Part Number 1=S1011E-02-ND, Voltage_V=1.8kV, Cert_UL=Y, ClassName=Header, CNHeader=TRUE, ComponentLink1Description="Datasheet URL", ComponentLink1URL=http://www.sullinscorp.com/catalogs/77_PAGE108-109_.100_MALE_HDR.pdf, CompType=Header, ContactFinish=Gold, CT=FALSE, Gender=Male, Green_EU RoHS=Passed, Green_EU RoHS-2=Passed, Green_Lifecycle=Active, Green_REACh=Passed, LatestRevisionDate=26/05/2017, MountType=TH, Orientation=Vertical, PackageReference="Sullins 100mil, 1x2, 230 mil above insulator", PartNumber=PBC02SAAN, PinCount=2, Pitch_mm=2.54, Publisher="Texas Instruments", RoHS=Y, Row_Count=1, Shrouded=N, Supplier 1=Digi-Key
J9: library part CMP-0086014-1, "Header, 2.54mm, 7x2, Gold, TH", Color=Black, Current_A=3A, Manufacturer="Wurth Elektronik", Voltage_V=250V, Cert_UL=Y, ClassName=Header, ComponentLink1Description="Datasheet URL", ComponentLink1URL=https://katalog.we-online.de/em/datasheet/6130xx21121.pdf, CompType=Header, ContactFinish=Gold, Gender=Male, MountType=TH, Orientation=Vertical, PackageReference="Header, 2.54mm, 7x2, TH", PartNumber=61301421121, PinCount=14, Pitch_mm=2.54, RoHS=Y, Row_Count=2, RowSpacing_mm=2.54, Shrouded=N
J10: library part CMP-0002339-2, "Header, 100mil, 7x2, Tin, TH", Color=Black, Current_A=3A, Manufacturer="Sullins Connector Solutions", Supplier Part Number 1=S2012E-07-ND, Voltage_V=1.8kV, Cert_UL=Y, ClassName=Header, ComponentLink1Description="Datasheet URL", ComponentLink1URL=http://www.sullinscorp.com/catalogs/77_PAGE108-109_.100_MALE_HDR.pdf, CompType=Header, ContactFinish=Tin, Gender=Male, Green_EU RoHS=Passed, Green_EU RoHS-2=Passed, Green_Lifecycle=Active, Green_REACh=Passed, MountType=TH, Orientation=Vertical, PackageReference="Header, 7x2, 100mil, Tin", PartNumber=PEC07DAAN, PinCount=14, Pitch_mm=2.54, RoHS=Y, Row_Count=2, RowSpacing_mm=2.54, Shrouded=N, Supplier 1=Digi-Key
J11: "Receptacle, USB 2.0, Micro B, 5 Position, R/A, SMT", Color=Black, Current_A=1.8A, Manufacturer=Molex, PartNumber=1051640001, Supplier Part Number 1=WM11263CT-ND, Voltage_V=30V, Cert_UL=Y, CNHeader=FALSE, ComponentLink1Description="Datasheet URL", ComponentLink1URL=http://www.molex.com/pdm_docs/sd/1051640001_sd.pdf, CompType=USB, ContactFinish=Gold, CT=TRUE, Gender=Female, LatestRevisionDate=26/05/2017, MountType=SMT, Orientation=R/A, PackageReference="Receptacle, USB 2.0, Micro B, 5 Pos, 0.65mm Pitch, R/A, SMT", PinCount=5, Pitch_mm=0.65, Publisher="Texas Instruments", RoHS=Y, Supplier 1=Digi-Key, Supplier 2=Newark, Supplier 3=Mouser, Supplier Part Number 2=99Y3224, Supplier Part Number 3=538-105164-0001
J12: library part CMP-0086764-1, Current_A=57A, Manufacturer=Wurth, Voltage_V=750V, ComponentLink1Description=Datasheet, ComponentLink1URL=https://katalog.we-online.de/em/datasheet/691256610002.pdf, ContactFinish=Zinc, PackageReference=HDR2, PartNumber=691256610002, PinCount=2, RoHS=TRUE, Row_Count=1, Symbol Name=SYM-691256610002
J13 J14 J23: library part CMP-0093233-1, "2 Position Wire to Board Terminal Block Horizontal with Board 0.250\" (6.35mm) Through Hole", Current_A=32A, Digikey Part Number=732-691250610002-ND, Manufacturer="Wurth Electronics", Mouser Part Number=710-691250610002, Operating Temperature Range="-32°C to +120°C", Voltage_V=450V, AEC Qualified=No, ComponentLink1Description=Datasheet, ComponentLink1URL=https://www.we-online.com/catalog/datasheet/691250610002.pdf, Conn Gender=Female, Conn Orientation=Horizontal, ContactFinish=Zinc, datasheet=https://www.we-online.com/catalog/datasheet/691250610002.pdf, Datasheet Path=datasheets/Conn-691250610002.pdf, Digikey Description="6.35 MM TERMINAL BLOCK, HORIZONT", DUT-Pitch_mm=6.35mm, helpURL=https://upverter.com/upn/revision/d28b3e63272a3f4f/, Is Female=yes, Lead Free=Yes, Max Wire Gauge=10, Min Wire Gauge=30, PackageReference=CONN_TERM_BLOCK2, Part Number=691250610002, PartNumber=691250610002, PinCount=2, RoHS=TRUE, Row_Count=1, SizeZ_mm=21.6mm, Supplier 1=Digikey, Supplier 2=Mouser, Supplier Part Number 1=732-691250610002-ND, Supplier Part Number 2=710-691250610002
J15 J21 J22 J24: library part CMP-0075110-1, "1mm Uninsulated Shorting Plug, 10.16mm spacing, TH", Manufacturer=Harwin, Supplier Part Number 1=952-1873-ND, CNHeader=False, ComponentLink1Description="Datasheet URL", ComponentLink1URL=http://cdn.harwin.com/pdfs/D3080-D3083.pdf, CompType="Jumper Wire", CT=False, Green_EU RoHS="Passed with Exemption", Green_EU RoHS-2=Passed, Green_Lifecycle=Active, Green_REACh=Passed, LatestRevisionDate=2017-07-12, MountType=TH, PackageReference="Shorting Plug, 10.16mm spacing, TH", PartNumber=D3082-05, Publisher="Texas Instruments", RoHS=Y, Supplier 1=Digi-Key, Supplier 2=Newark, Supplier 3=Mouser, Supplier Part Number 2=01E9240, Supplier Part Number 3=855-D3082-05
J27: library part CMP-77940-000002-1, "CONN HEADER VERT 3POS 2.54MM", Current Rating=3A, Manufacturer="Metz Connect", Temperature="-40°C to +105°C", Temperature Range High=+105°C, Temperature Range Low=-40°C, Automotive=No, Category=Conn, ComponentLink2Description=Datasheet, ComponentLink2URL=https://datasheet.octopart.com/PR20203VBNN-Metz-Connect-datasheet-101610322.pdf, Conn Gender=Male, Conn Orientation=Straight, Contact Material=Gold,Nickel, Device Class L1=Connectors, Device Class L2="Headers and Wire Housings", Device Class L3=unset, Digikey Description="CONN HEADER VERT 3POS 2.54MM", Height=8.6mm, Lead Free=Yes, Manufacturer Part Number=PR20203VBNN, Number Of Contacts=3, Number Of Rows=1, Octopart=https://octopart.com/pr20203vbnn-metz+connect-87667116, Package=PR20203VBNN, Pitch=2.54mm, RoHS=TRUE
L1 L2: library part CMP-0081962-1, "Ferrite Bead, 150 ohm @ 100 MHz, 0.7 A, 0603", Manufacturer=MuRata, Supplier Part Number 1=490-14035-1-ND, Value1="0.35 ohm", Value2=0.7A, ValueDisplayed="150 ohm", ComponentLink1Description="Datasheet link", ComponentLink1URL=http://www.murata.com/en-us/products/productdata/8798137286686/QNFA9129.pdf, CompType="Ferrite Bead", DCR_ohm=0.35, Imax_A=700mA, MountType=SMT, PackageReference=0603, PartNumber=BLM18AG151BH1D, RoHS=Y, SizeArea_mm2=1.28, SizeAreaWB_mm2=4.68, SizeX_mm=1.6, SizeY_mm=0.8, SizeZ_mm=1, Supplier 1=Digi-Key, Supplier 2=Mouser, Supplier Part Number 2=81-BLM18AG151BH1D, ZTyp@100MHz_Ohm=150
LBL1: library part CMP-0003625-1, "Thermal Transfer Printable Labels, 0.650\" W x 0.200\" H - 10,000 per roll", Manufacturer=Brady, Supplier Part Number 1=97C5133, ClassName=Label, ComponentLink1Description="Web Page", ComponentLink1URL=http://www.bradyid.com/bradyid/pdpv/THT-14-423-10.html, CompType=Label, Key=THT-14-423-10, LatestRevisionDate=2017-03-09, MountType=N/A, Note="Size: 0.65\" x 0.20 \"", PackageReference="PCB Label 0.650 x 0.200 inch", PartNumber=THT-14-423-10, Publisher="Texas Instruments", RoHS=Y, Supplier 1=Newark, Supplier 2=Farnell, Supplier Part Number 2=2065596
LOGO1: library part CMP-0074837-1, "IEC 61010-1 Hot Surface Warning", LatestRevisionDate=2017-07-06, Lib Reference=IEC_HotSurface, PartNumber="CAUTION HOT SURFACE", Published=2009-03-03, Publisher="Texas Instruments", SymbolCreator=a0412235, SymbolVersion=2011-08-22
Logo2: library part CMP-0074844-1, LatestRevisionDate=2017-07-06, Lib Reference="CE Mark", PartNumber="CE Mark", Published=2009-03-03, Publisher="Texas Instruments", SymbolCreator=a0412235
Logo3: library part CMP-0074838-1, "Texas Instrument Corporate Signature", ClassName=Logo, LatestRevisionDate=2017-07-06, Lib Reference=TI_Logo, PartNumber="Texas Instruments", Published=2009-03-03, Publisher="Texas Instruments", SymbolCreator=a0412235, SymbolVersion=2011-08-22
Logo4: library part CMP-0074847-1, "FCC_disclaimer", LatestRevisionDate=2017-07-06, Lib Reference=FCC_disclaimer, PartNumber="FCC disclaimer", Published=2009-03-03, Publisher="Texas Instruments"
Logo5: library part CMP-0074769-1, Lib Reference="WEEE logo", PartNumber="WEEE logo"
Logo6: library part CMP-0074836-1, "IEC 61010-1 Caution Warning", LatestRevisionDate=2017-07-06, Lib Reference=IEC_Caution, PartNumber="CAUTION.  READ USER GUIDE BEFORE USE", Published=2009-03-03, Publisher="Texas Instruments", SymbolCreator=a0412235, SymbolVersion=2011-08-22
Q1: library part CMP-1048-00779-1, "General Purpose Transistor, NPN Silicon, 3-Pin SOT-23, Pb-Free, Tape and Reel", Manufacturer="On Semiconductor", ComponentLink1Description="Manufacturer URL", ComponentLink1URL=http://www.onsemi.com/, ComponentLink2Description=Datasheet, ComponentLink2URL=http://www.onsemi.cn/pub_link/Collateral/BC846ALT1-D.PDF, ComponentLink3Description="Package Specification", ComponentLink3URL=http://www.onsemi.cn/pub_link/Collateral/318-08.PDF, DatasheetVersion="Rev. 11", fT Min (MHz)=100, IC Continuous (A)=0.1, Mounting Technology="Surface Mount", PackageDescription="3-Pin Small Outline Transistor, Body 2.92 x 1.3 mm, Pitch 0.95 mm", PackageReference=SOT-23-3-318-08, PackageVersion="Rev. AP, 11/2009", Packing="Tape and Reel", PartNumber=BC846BLT1G, Polarity=NPN, RoHS=TRUE
R1 R5 R6 R7 R8 R9 R10 R11 R12 R13 R14 R15 R16 R17 R18 R20 R21 R22 R23 R24 R25 R26 R27 R30 R32 R33 R34 R54 R68: library part CMP-0026992-3, "RES, 0, 5%, 0.1 W, AEC-Q200 Grade 0, 0402", Manufacturer=Panasonic, PartNumber=ERJ-2GE0R00X, Power_W=100mW, Supplier Part Number 1=P0.0JCT-ND, TempCo="600 ppm/C", Tolerance_%=5%, Value2=0.1W, Value_Code=0000, ValueDisplayed=0, AEC Category=Q200, AEC Grade=0, AEC Qualified=Y, ComponentLink1Description="Datasheet link", ComponentLink1URL=https://industrial.panasonic.com/cdbs/www-data/pdf/RDA0000/AOA0000C301.pdf, CompType=Resistor, EIA_Code=E24, MountType=SMT, PackageReference=0402, Res_ohm=0, RoHS=Y, SizeArea_mm2=0.5, SizeAreaWB_mm2=3, SizeX_mm=1, SizeY_mm=0.5, SizeZ_mm=0.6, Supplier 1=Digi-Key, Supplier 2=Newark, Supplier 3=Mouser, Supplier Part Number 2=65T8307, Supplier Part Number 3=667-ERJ-2GE0R00X, Technology="Thick Film", Value1=5%, VDC_V=50V
R2 R3: library part CMP-0025784-3, "RES, 330 k, 5%, 0.1 W, 0603", Manufacturer=Vishay-Dale, Power_W=100mW, Supplier Part Number 1=541-330KGCT-ND, TempCo="200 ppm/C", Tolerance_%=5%, Value2=0.1W, Value_Code=330k, AEC Category=Q200, AEC Qualified=?, ComponentLink1Description="Datasheet link", ComponentLink1URL=http://www.vishay.com/docs/20035/dcrcwe3.pdf, CompType=Resistor, EIA_Code=E24, LatestRevisionDate=2017-03-09, MountType=SMT, PackageReference=0603, PartNumber=CRCW0603330KJNEA, Published=2008-06-26, Publisher="Texas Instruments", Res_ohm=330k, RoHS=Y, SizeArea_mm2=1.28, SizeX_mm=1.6, SizeY_mm=0.8, SizeZ_mm=1, Supplier 1=Digi-Key, Supplier 2=Newark, Supplier 3=Mouser, Supplier Part Number 2=59M6804, Supplier Part Number 3=71-CRCW0603J-330K-E3, Technology="Thick Film", U/M=EA, Value1=5%, ValueDisplayed=330k, VDC_V=75V
R4 R35: library part CMP-0091848-1, "10 Ohms ±5% 0.05W, 1/20W Chip Resistor 0402 (1005 Metric) RF, High Frequency Thin Film", Digikey Part Number=716-CH0402-10RJFPTCT-ND, Manufacturer=Vishay, Mouser Part Number=71-CH0402-10RJFPT, Operating Temperature Range="-55°C to +155°C", Power_W=50mW, TempCo=100ppm/°C, Tolerance_%=5%, AEC Qualified=No, ComponentLink1Description=Datasheet, ComponentLink1URL=https://www.vishay.com/docs/53014/ch.pdf, datasheet=https://www.vishay.com/docs/53014/ch.pdf, Datasheet Path=datasheets/Res-CH0402-10RJFPT.pdf, Digikey Description="RES CH 0402 THIN FILM", helpURL=https://upverter.com/upn/revision/6d0c3c4c3a52dca5/, Lead Free=Yes, Mouser Description="High Frequency/RF Resistors 50mWatt 10ohms 5% Flip Chip", PackageReference=0402, Part Number=CH0402-10RJFPT, PartNumber=CH0402-10RJFPT, Res_ohm=10, RoHS=TRUE, Series=CH, SizeZ_mm=0.627mm, Supplier 1=Digikey, Supplier 2=Mouser, Supplier Part Number 1=716-CH0402-10RJFPTCT-ND, Supplier Part Number 2=71-CH0402-10RJFPT, Technology="Thin Film", VDC_V=37V
R19 R44 R49: library part CMP-0021998-3, "RES, 10.0 k, 1%, 0.1 W, 0603", Manufacturer=Vishay-Dale, Power_W=100mW, Supplier Part Number 1=541-10.0KHCT-ND, TempCo="100 ppm/C", Tolerance_%=1%, Value2=0.1W, Value_Code=10k0, ValueDisplayed=10.0k, AEC Category=Q200, AEC Qualified=?, ComponentLink1Description="Datasheet link", ComponentLink1URL=http://www.vishay.com/docs/20035/dcrcwe3.pdf, CompType=Resistor, EIA_Code=E96, LatestRevisionDate=2017-03-09, MountType=SMT, PackageReference=0603, PartNumber=CRCW060310K0FKEA, Published=2008-06-26, Publisher="Texas Instruments", Res_ohm=10k, RoHS=Y, SizeArea_mm2=1.28, SizeX_mm=1.6, SizeY_mm=0.8, SizeZ_mm=1, Supplier 1=Digi-Key, Supplier 2=Newark, Supplier 3=Mouser, Supplier Part Number 2=52K8062, Supplier Part Number 3=71-CRCW0603-10K-E3, Technology="Thick Film", U/M=EA, Value1=1%, VDC_V=75V
R29: library part CMP-2002-07701-1, Manufacturer="Yageo / Phycomp", Part Number=RC0402FR-0747KL
R39 R40 R41 R42: library part CMP-0026071-2, "RES, 1.00 k, 1%, 0.063 W, 0402", Manufacturer=Vishay-Dale, Power_W=63mW, Supplier Part Number 1=541-1.00KLCT-ND, TempCo="100 ppm/C", Tolerance_%=1%, Value2=0.063W, Value_Code=1k00, ValueDisplayed=1.00k, AEC Category=Q200, AEC Qualified=?, ComponentLink1Description="Datasheet link", ComponentLink1URL=http://www.vishay.com/docs/20035/dcrcwe3.pdf, CompType=Resistor, EIA_Code=E96, LatestRevisionDate=2017-03-09, MountType=SMT, PackageReference=0402, PartNumber=CRCW04021K00FKED, Published=2008-06-26, Publisher="Texas Instruments", Res_ohm=1k, RoHS=Y, SizeArea_mm2=0.5, SizeX_mm=1, SizeY_mm=0.5, SizeZ_mm=0.6, Supplier 1=Digi-Key, Supplier 2=Newark, Supplier 3=Mouser, Supplier Part Number 2=52K6545, Supplier Part Number 3=71-CRCW0402-1.0K-E3, Technology="Thick Film", U/M=EA, Value1=1%, VDC_V=50V
R55 R60: library part CMP-0026728-1, "RES, 220 k, 1%, 0.0625 W, 0402", Manufacturer="Yageo America", Power_W=62.5mW, Supplier Part Number 1=311-220KLRCT-ND, TempCo="100 ppm/C", Tolerance_%=1%, Value2=0.0625W, Value_Code=220k, AEC Category=Q200, AEC Grade=N/A, AEC Qualified=N, ComponentLink1Description="Datasheet link", ComponentLink1URL=http://www.yageo.com/documents/recent/PYu-RC0402_51_RoHS_L_6_r.pdf, CompType=Resistor, LatestRevisionDate=2017-03-09, MountType=SMT, PackageReference=0402, PartNumber=RC0402FR-07220KL, Published=2008-06-26, Publisher="Texas Instruments", Res_ohm=220k, RoHS=Y, SizeArea_mm2=0.5, SizeX_mm=1, SizeY_mm=0.5, SizeZ_mm=0.6, Supplier 1=Digi-Key, Supplier 2=Newark, Supplier 3=Mouser, Supplier Part Number 2=98K7527, Supplier Part Number 3=603-RC0402FR-07220KL, Technology="Thick Film", U/M=EA, Value1=1%, ValueDisplayed=220k, VDC_V=50V
R56: library part CMP-2002-00799-3, "Chip Resistor, 240 KOhm, +/- 1%, 100 mW, -55 to 155 degC, 0402 (1005 Metric), RoHS, Tape and Reel", Case Code (Imperial)=0402, Case Code (Metric)=1005, Manufacturer="Basic Passives", Max Operating Temperature="155 degC", Min Operating Temperature="-55 degC", Package Quantity=10000, PartNumber=ERJ-2RKF2403X, Power Rating="100 mW", Resistance="240 KOhm", Tolerance=1%, Voltage Rating="50 V", Case\/Package=0402, ComponentLink1Description="Manufacturer URL", ComponentLink1URL=http://www.panasonic.com/, ComponentLink2Description=Datasheet, ComponentLink2URL=http://industrial.panasonic.com/cdbs/www-data/pdf/RDA0000/AOA0000C86.pdf, DatasheetVersion=04/2015, Height="0.35 mm", Length="1 mm", Mount="Surface Mount", Mounting Technology="Surface Mount", PackageDescription="2-Pin Surface Mount Device, Body 1 x 0.5 mm", PackageReference=0402, Packaging="Tape and Reel", Pins=2, Radiation Hardening=No, REACH SVHC=Unknown, RoHSCompliant=true, Width="0.5 mm"
R57 R97: library part CMP-0026935-3, "RES, 47 k, 5%, 0.063 W, AEC-Q200 Grade 0, 0402", Manufacturer=Vishay-Dale, Power_W=63mW, Supplier Part Number 1=541-47KJCT-ND, TempCo="200 ppm/C", Tolerance_%=5%, Value2=0.063W, Value_Code=47k0, ValueDisplayed=47k, AEC Category=Q200, AEC Grade=0, AEC Qualified=Y, ComponentLink1Description="Datasheet link", ComponentLink1URL=http://www.vishay.com/docs/20035/dcrcwe3.pdf, CompType=Resistor, EIA_Code=E24, MountType=SMT, PackageReference=0402, PartNumber=CRCW040247K0JNED, Res_ohm=47k, RoHS=E, SizeArea_mm2=0.5, SizeX_mm=1, SizeY_mm=0.5, SizeZ_mm=0.6, Supplier 1=Digi-Key, Supplier 2=Newark, Supplier 3=Mouser, Supplier Part Number 2=52K7099, Supplier Part Number 3=71-CRCW0402-J-47K-E3, Technology="Thick Film", Value1=5%, VDC_V=50V
R58: library part CMP-0026934-3, "RES, 470, 5%, 0.063 W, AEC-Q200 Grade 0, 0402", Manufacturer=Vishay-Dale, Power_W=63mW, Supplier Part Number 1=541-470JCT-ND, TempCo="200 ppm/C", Tolerance_%=5%, Value2=0.063W, Value_Code=470R, ValueDisplayed=470, AEC Category=Q200, AEC Grade=0, AEC Qualified=Y, ComponentLink1Description="Datasheet link", ComponentLink1URL=http://www.vishay.com/docs/20035/dcrcwe3.pdf, CompType=Resistor, EIA_Code=E24, MountType=SMT, PackageReference=0402, PartNumber=CRCW0402470RJNED, Res_ohm=470, RoHS=E, SizeArea_mm2=0.5, SizeX_mm=1, SizeY_mm=0.5, SizeZ_mm=0.6, Supplier 1=Digi-Key, Supplier 2=Newark, Supplier 3=Mouser, Supplier Part Number 2=59M6737, Supplier Part Number 3=71-CRCW0402J-470-E3, Technology="Thick Film", Value1=5%, VDC_V=50V
R59: library part CMP-0026948-3, "RES, 560, 5%, 0.063 W, AEC-Q200 Grade 0, 0402", Manufacturer=Vishay-Dale, Power_W=63mW, Supplier Part Number 1=541-560JCT-ND, TempCo="200 ppm/C", Tolerance_%=5%, Value2=0.063W, Value_Code=560R, ValueDisplayed=560, AEC Category=Q200, AEC Grade=0, AEC Qualified=Y, ComponentLink1Description="Datasheet link", ComponentLink1URL=http://www.vishay.com/docs/20035/dcrcwe3.pdf, CompType=Resistor, EIA_Code=E24, MountType=SMT, PackageReference=0402, PartNumber=CRCW0402560RJNED, Res_ohm=560, RoHS=E, SizeArea_mm2=0.5, SizeX_mm=1, SizeY_mm=0.5, SizeZ_mm=0.6, Supplier 1=Digi-Key, Supplier 2=Newark, Supplier 3=Mouser, Supplier Part Number 2=59M6740, Supplier Part Number 3=71-CRCW0402J-560-E3, Technology="Thick Film", Value1=5%, VDC_V=50V
R61: library part CMP-0026021-3, "RES, 150 k, 1%, 0.063 W, AEC-Q200 Grade 0, 0402", Manufacturer=Vishay-Dale, Power_W=63mW, Supplier Part Number 1=541-150KLCT-ND, TempCo="100 ppm/C", Tolerance_%=1%, Value2=0.063W, Value_Code=150k, AEC Category=Q200, AEC Grade=0, AEC Qualified=Y, ComponentLink1Description="Datasheet link", ComponentLink1URL=http://www.vishay.com/docs/20035/dcrcwe3.pdf, CompType=Resistor, EIA_Code=E96, MountType=SMT, PackageReference=0402, PartNumber=CRCW0402150KFKED, Res_ohm=150k, RoHS=E, SizeArea_mm2=0.5, SizeX_mm=1, SizeY_mm=0.5, SizeZ_mm=0.6, Supplier 1=Digi-Key, Supplier 2=Newark, Supplier 3=Mouser, Supplier Part Number 2=52K6719, Supplier Part Number 3=71-CRCW0402-150K-E3, Technology="Thick Film", Value1=1%, ValueDisplayed=150k, VDC_V=50V
R62 R63: library part CMP-0026992-3, "RES, 0, 5%, 0.1 W, AEC-Q200 Grade 0, 0402", Manufacturer=Panasonic, Power_W=100mW, Supplier Part Number 1=P0.0JCT-ND, TempCo="600 ppm/C", Tolerance_%=5%, Value2=0.1W, Value_Code=0000, ValueDisplayed=0, AEC Category=Q200, AEC Grade=0, AEC Qualified=Y, ComponentLink1Description="Datasheet link", ComponentLink1URL=https://industrial.panasonic.com/cdbs/www-data/pdf/RDA0000/AOA0000C301.pdf, CompType=Resistor, EIA_Code=E24, MountType=SMT, PackageReference=0402, PartNumber=ERJ-2GE0R00X, Res_ohm=0, RoHS=Y, SizeArea_mm2=0.5, SizeAreaWB_mm2=3, SizeX_mm=1, SizeY_mm=0.5, SizeZ_mm=0.6, Supplier 1=Digi-Key, Supplier 2=Newark, Supplier 3=Mouser, Supplier Part Number 2=65T8307, Supplier Part Number 3=667-ERJ-2GE0R00X, Technology="Thick Film", Value1=5%, VDC_V=50V